# Altium PCB PCI Express Mini_3000X5095_52PIN_Full-Mini-Type F1.PCBDOC (part 7 of 7)
Units mm, origin at the board's own origin, x right, y up, seen from the top; angles counter-clockwise.
Board outline 70 x 83.2 mm, 6 copper layers (TopLayer, Layer 1, Layer 2, Layer 3, Layer 4, Bottom Layer), stack 1.013 mm thick; 332 components, 213 nets, 1105 pads, 528 vias.
Unrouted connection lines stored in the file: 10.
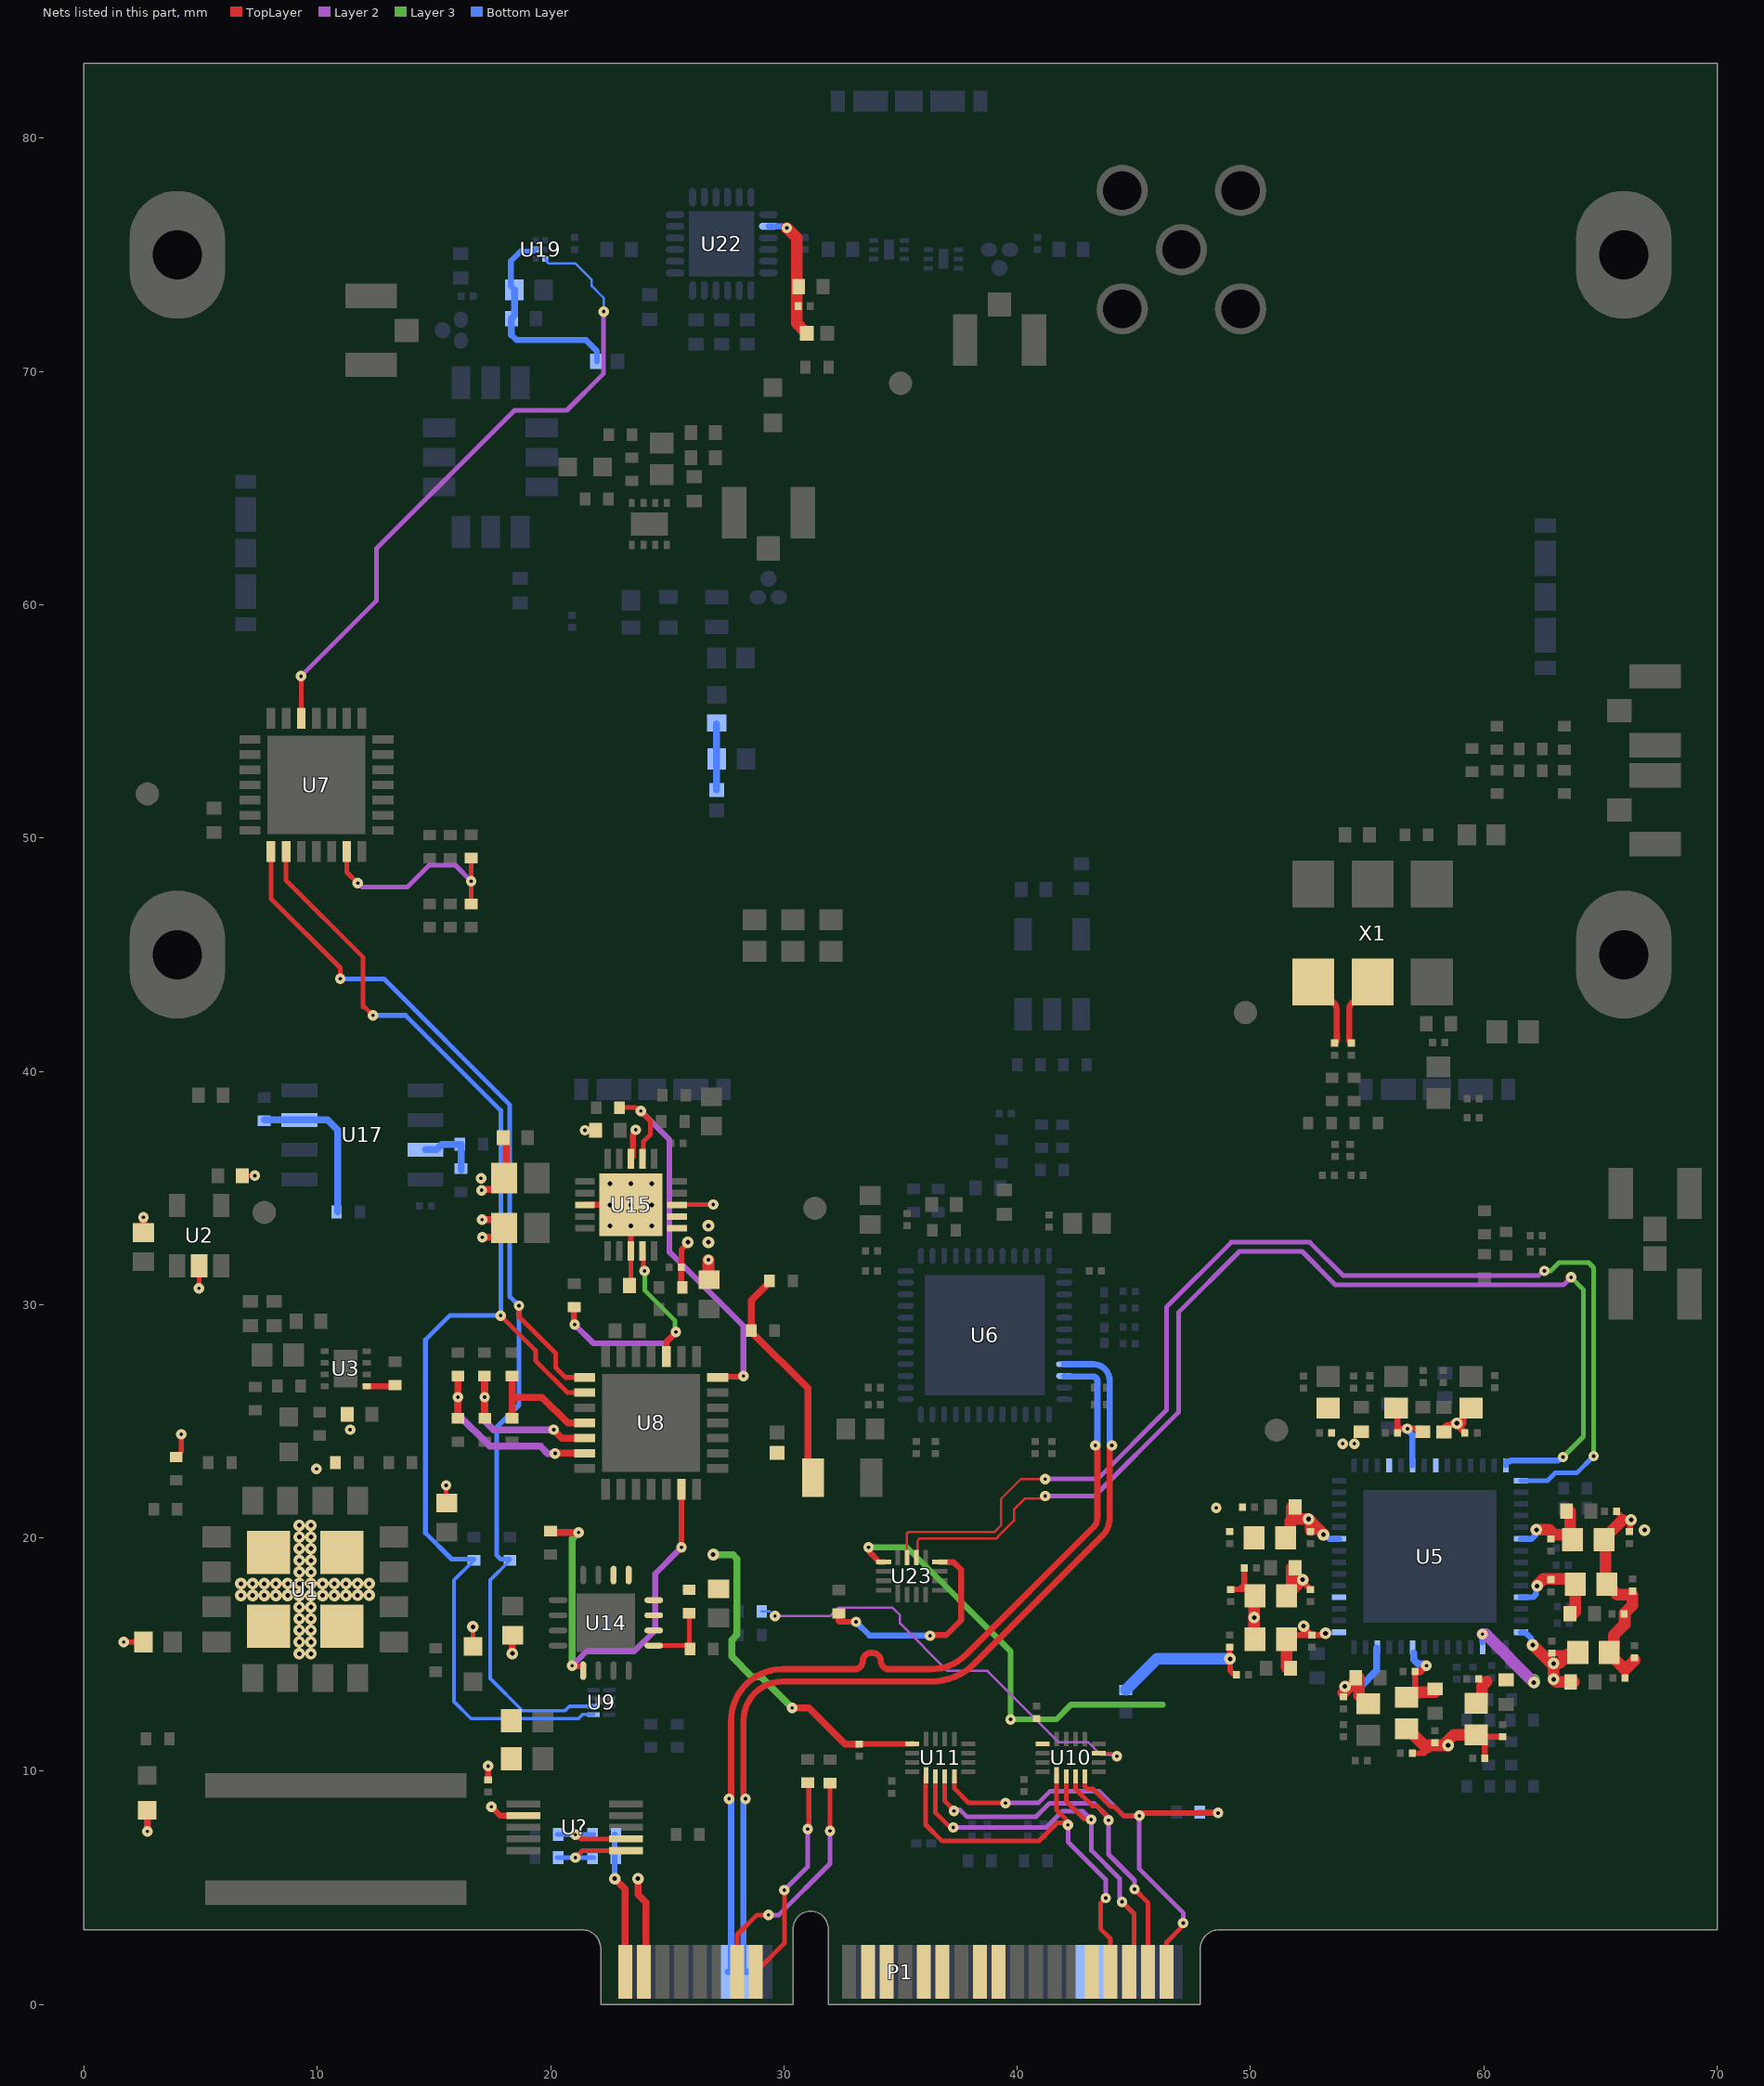
[diagram p8: the nets of this part, all layers, seen from the top]

## Via types
v1: diameter 0.45, hole 0.15, TopLayer to Bottom Layer, tented both sides, 263 vias
v2: diameter 0.5, hole 0.2, TopLayer to Bottom Layer, tented both sides, 200 vias
v3: diameter 0.5, hole 0.2, TopLayer to Bottom Layer, 36 vias
v4: diameter 0.45, hole 0.15, TopLayer to Bottom Layer, 29 vias

## Nets (pads, with @x,y where several pads share a name; then routed paths per layer and width w, separated by ;. In a path a pad name is that pad's centre, name@x,y a point inside that pad or via, vN(x,y) a via of type N, cw(c..) or ccw(c..) an arc to the next point about the centre after c; other vN are vias at no path point) (continued)
NetR59_2: R59.2 R62.2 U7.13 | length 9.2
  TopLayer w0.2: U7.13@11.267,49.427 11.267,48.536 v1(11.737,48.066) ; R59.2@16.596,47.127 v1(16.596,48.153) R62.2@16.596,49.189
  Layer 2 w0.2: v1(11.737,48.066) 11.757,48.066 11.917,47.906 13.87,47.906 14.795,48.832 15.917,48.832 v1(16.596,48.153)
NetR67_2: R67.2 R72.2 U8.11 | length 5.5
  TopLayer w0.3: R72.2@18.351,25.073 18.351,26.033 ; R67.2@18.351,26.992 18.351,26.033 ; U8.11@21.46,24.929 20.74,24.929 19.637,26.033 18.351,26.033
NetR68_2: R68.2 R73.2 U8.12 | length 7.5
  TopLayer w0.3: R68.2@17.162,26.992 17.174,26.98 v1(17.174,26.033) 17.174,25.086 R73.2@17.187,25.073 ; v1(20.133,24.638) 20.492,24.279 U8.12@21.46,24.279
  Layer 2 w0.3: v1(17.174,26.033) 17.162,26.02 17.162,25.031 17.554,24.638 v1(20.133,24.638)
NetR69_2: R69.2 R74.2 U8.13 | length 8.8
  TopLayer w0.3: R74.2@16.032,25.073 v1(16.032,26.033) R69.2@16.032,26.992 ; v1(20.193,23.622) 20.2,23.629 U8.13@21.46,23.629
  Layer 2 w0.3: v1(16.032,26.033) 16.032,25.595 16.032,25.29 17.396,23.926 19.561,23.926 19.865,23.622 v1(20.193,23.622)
NetR75_2: R75.2 U23.8 | length 9.3
  TopLayer w0.25: R75.2@32.349,16.764 32.349,16.444 32.393,16.401 v1(33.093,16.401) ; v1(36.264,15.809) 36.288,15.834 36.954,15.834 37.592,16.472 37.592,18.642 37.27,18.964 U23.8@36.677,18.964
  Bottom Layer w0.25: v1(33.093,16.401) 33.672,15.821 36.251,15.821 v1(36.264,15.809)
NetR87_1: R87.1 U10.7 | length 19.2
  TopLayer w0.1: U10.7@43.495,10.779 44.047,10.779 44.178,10.648 v1(44.272,10.648)
  Layer 2 w0.1: v1(29.617,16.653) 31.984,16.653 32.339,17.007 34.662,17.007 34.975,16.694 34.975,16.341 37.014,14.301 38.722,14.301 41.792,11.232 43.055,11.232 43.582,10.705 44.215,10.705 v1(44.272,10.648)
  Layer 3 w0.1: v1@29.617,16.607 v1(29.617,16.653)
  Bottom Layer w0.1: R87.1@29.05,16.852 29.399,16.852 29.598,16.653 v1(29.617,16.653)
NetR98_1: R98.1 R99.2 U14.9 | length 3.1
  TopLayer w0.2: U14.9@24.423,15.384 R99.2@25.883,15.384 ; R98.1@25.942,16.826 25.942,15.325 R99.2@26.025,15.242
NetR108_1: R108.1 R110.2 U?.2 | length 3.8
  TopLayer w0.2: v1(21.064,7.285) 21.118,7.285 21.309,7.094 U?.2@23.227,7.094
  Bottom Layer w0.2: R110.2@20.275,7.285 v1(21.064,7.285) R108.1@21.853,7.285
NetR109_1: R109.1 R111.2 U?.1 | length 3.9
  TopLayer w0.2: v1(21.062,6.294) 21.362,6.594 U?.1@23.227,6.594
  Bottom Layer w0.2: R111.2@20.28,6.294 v1(21.062,6.294) R109.1@21.844,6.294
NetR112_1: R112.1 R115.2 U17.7 | length 2.7
  Bottom Layer w0.3: U17.7@14.637,36.644 15.112,36.644 15.34,36.872 16.161,36.872 R112.1@16.161,35.78
NetR113_1: R113.1 R114.2 U17.3 | length 6.8
  Bottom Layer w0.3: R114.2@7.728,37.931 7.737,37.922 9.228,37.922 U17.3@9.237,37.914 10.439,37.914 10.877,37.475 R113.1@10.877,33.977
NetR123_2: R123.2 U3.5 | length 1.3
  TopLayer w0.25: U3.5@12.116,26.507 13.233,26.507 R123.2@13.329,26.602
PER0_N: P1.21
PER0_P: P1.19
PER1_N: P1.27
PER1_P: P1.25
PER2_N: P1.33
PER2_P: P1.31
PERST2#: P1.43
PET3_N: P1.44
PET3_P: P1.42
PG_LMK_1V8: R105.1 U8.3 U15.9 | length 10.9
  TopLayer w0.2: U15.9@23.945,32.304 23.985,32.264 23.985,31.487 v1(24.03,31.442)
  TopLayer w0.25: R105.1@21.01,29.895 21.005,29.891 21.005,29.173 v1(21.031,29.147) ; U8.3@24.96,27.779 24.96,28.402 25.375,28.817 v1(25.375,28.829)
  Layer 2 w0.25: v1(21.031,29.147) 21.837,28.341 24.899,28.341 25.375,28.817 v1(25.375,28.829)
  Layer 3 w0.2: v1(24.03,31.442) 24.03,30.619 25.327,29.322 25.327,28.877 v1(25.375,28.829)
PG_LMK_3V3: R104.1 U8.28 U15.17 | length 17.6
  TopLayer w0.2: R104.1@22.96,38.442 23.651,38.442 23.797,38.296 v1(23.864,38.296) ; v1@23.856,38.305 24.271,37.889 24.271,37.477 24.284,37.465 24.284,37.299 23.985,37 23.985,36.294 U15.17@23.945,36.254
  TopLayer w0.25: U8.28@27.16,26.879 27.193,26.912 28.235,26.912 v1(28.264,26.941)
  Layer 2 w0.25: v1(23.864,38.296) 25.096,37.065 25.096,32.256 28.264,29.089 v1(28.264,26.941)
PG_LTC2122: R97.1 U8.20 U14.5 | length 18.2
  TopLayer w0.25: v1(20.923,14.52) 20.952,14.492 U14.5@21.398,14.492 ; v1(25.61,19.594) U8.20@25.61,22.079
  TopLayer w0.3: R97.1@19.993,20.241 19.997,20.237 21.201,20.237 v1(21.205,20.233)
  Layer 2 w0.25: v1(20.923,14.52) 21.544,15.141 23.581,15.141 24.481,16.042 24.481,18.465 v1(25.61,19.594)
  Layer 3 w0.3: v1(20.923,14.52) 20.923,19.951 v1(21.205,20.233)
PGND: C1.1 C2.1 C3.1 C5.1 C6.1 C10.1 C91.1 C139.1 C140.1 C151.1 C152.1 C153.1 D9.2 D11.2 FB30.1 FB31.1 P1.1 P1.3 R4.1 R5.1 R108.2 R109.2 U1.EP U2.2 U15.3 U15.8 U15.13 U15.18 U15.21 U?.7 | length 32
  TopLayer w0.2: v1(1.702,15.538) C1.1@2.606,15.538 ; R5.1@3.955,23.47 4.005,23.47 4.13,23.595 4.13,23.671 4.171,23.712 v1(4.171,24.445) ; v1(4.931,30.696) 4.931,31.539 U2.2@4.938,31.545 ; C5.1@6.657,35.524 v1@7.332,35.524 ; v1(15.519,22.25) 15.519,21.538 C2.1@15.558,21.5 ; D9.2@16.674,15.344 v2(16.674,16.194) ; v1(21.47,37.475) C152.1@22.051,37.475 ; C151.1@23.385,30.822 23.445,30.882 U15.8@23.445,32.304 ; U15.13@25.577,34.278 25.587,34.288 v1(26.969,34.288)
  TopLayer w0.25: C153.1@17.323,9.627 v1(17.323,10.22) ; v1(17.46,8.472) 17.837,8.094 U?.7@18.827,8.094 ; U15.3@21.47,34.279 v2(22.545,34.279) v2(23.445,34.279) v2(23.445,33.379) U15.8@23.445,32.304 ; U15.18@23.445,36.254 23.528,36.337 23.528,37.317 23.653,37.441 v1(23.653,37.495)
  TopLayer w0.3: C3.1@2.55,33.183 v1(2.55,33.747) ; v1(2.715,7.421) D11.2@2.715,8.325 ; v1(17.061,33.648) C139.1@17.625,33.647 ; v1@17.061,34.946 C140.1@17.625,34.946 ; v1(17.074,32.886) C139.1@17.638,32.885 ; C140.1@18.011,35.427 18.101,35.517 C10.1@18.101,37.154 ; v2(18.36,15.044) 18.36,15.817 C91.1@18.376,15.834 ; v2(22.753,5.397) 23.2,4.95 P1.1@23.2,1.4 ; v2(23.748,5.397) 23.748,4.717 24.086,4.379 24.086,1.414 P1.3@24.072,1.4
  Bottom Layer w0.25: v2(22.753,5.397) 22.749,5.401 22.749,6.29 22.744,6.294 22.749,6.299 22.749,7.28 R108.2@22.753,7.285
  other v1: 9.967,22.958 11.408,24.638 17.048,34.903 17.019,35.411 7.329,35.53
  other v2: 9.228,15.038 9.728,15.038 9.228,15.538 9.728,15.538 9.228,16.038 9.728,16.038 9.228,16.538 9.728,16.538 9.229,17.039 9.729,17.039 6.729,17.538 7.229,17.538 7.729,17.538 8.229,17.538 8.729,17.539 9.229,17.539 9.729,17.539 10.229,17.539 10.729,17.539 11.229,17.539 11.728,17.539 12.228,17.54 6.729,18.038 7.229,18.038 7.729,18.038 8.229,18.038 8.729,18.039 9.229,18.039 9.729,18.039 10.229,18.039 10.729,18.039 11.229,18.039 11.728,18.039 12.228,18.04 9.229,18.539 9.729,18.539 9.228,19.039 9.728,19.039 9.228,19.539 9.728,19.539 9.228,20.039 9.728,20.039 9.228,20.539 9.728,20.539 22.545,33.379 24.345,33.379 24.345,34.279 22.545,35.179 23.445,35.179 24.345,35.179
PON_TETRA: U7.26 U19.6 | length 28.1
  TopLayer w0.2: v1(9.302,56.938) 9.309,56.931 9.309,55.135 U7.26@9.317,55.127
  Layer 2 w0.2: v1(9.302,56.938) 12.546,60.181 12.546,62.426 18.452,68.332 20.697,68.332 22.276,69.912 v1(22.276,72.568)
  Bottom Layer w0.1: U19.6@19.767,74.859 U19.6@19.767,74.825 19.842,74.75 19.842,74.694 19.9,74.635 21.062,74.635 21.768,73.929 21.768,73.659 22.276,73.151 v1(22.276,72.568)
ResetN_1V8: U5.15 U23.11 | length 51.6
  TopLayer w0.1: U23.11@35.277,19.164 35.277,20.191 35.335,20.249 38.613,20.249 39.021,20.249 39.31,20.538 39.31,21.675 40.158,22.523 v4@41.353,22.523
  Layer 2 w0.2: v4(41.199,22.523) 43.447,22.523 46.406,25.482 46.406,29.902 49.177,32.673 52.544,32.673 53.961,31.256 62.353,31.256 62.541,31.444 v1(62.595,31.444)
  Layer 3 w0.2: v1(62.595,31.444) 62.868,31.444 63.229,31.805 64.488,31.805 64.704,31.589 v1(64.704,23.506)
  Bottom Layer w0.2: U5.15@61.593,22.456 62.732,22.456 63.057,22.781 63.979,22.781 v1(64.704,23.506)
SCK: R11.2 U7.8 U8.8 U9.6 | length 52
  TopLayer w0.2: U7.8@8.017,49.427 8.017,47.402 10.983,44.436 v1(10.983,43.967) ; v1(18.645,29.954) 18.645,29.485 20.209,27.921 20.209,27.306 20.635,26.879 U8.8@21.46,26.879
  Bottom Layer w0.15: R11.2@18.257,19.089 R11.2@18.257,19.039 17.411,18.192 17.411,13.973 18.793,12.591 20.614,12.591 20.805,12.781 U9.6@21.844,12.781
  Bottom Layer w0.2: v1(10.983,43.967) 12.852,43.967 18.257,38.563 18.257,30.342 v1(18.645,29.954) 18.645,25.695 17.688,24.738 17.688,19.262 17.861,19.089 R11.2@18.257,19.089
SDA: R10.2 U7.9 U8.9 U9.5 | length 57.1
  TopLayer w0.2: U7.9@8.667,49.427 8.663,49.424 8.663,48.199 8.659,48.195 11.966,44.888 11.966,42.756 12.033,42.756 v1(12.391,42.398) ; v1(17.861,29.531) 19.357,28.035 19.357,27.592 20.72,26.229 U8.9@21.46,26.229
  Bottom Layer w0.15: R10.2@16.711,19.089 R10.2@16.711,19.039 15.861,18.189 15.861,12.981 16.589,12.253 21.188,12.253 21.367,12.431 U9.5@21.844,12.431
  Bottom Layer w0.2: v1(12.391,42.398) 13.787,42.398 17.861,38.325 v1(17.861,29.531) 15.675,29.531 14.637,28.493 14.637,20.214 15.762,19.089 R10.2@16.711,19.089
SMCLK: P1.15 R71.1 | length 9
  TopLayer w0.2: P1.15@28.8,1.4 30.021,2.621 v1(30.021,4.904) ; v4(31.025,7.517) 31.025,7.571 31.072,7.618 R71.1@31.072,9.507
  Layer 2 w0.2: v1(30.021,4.904) 31.025,5.908 v4(31.025,7.517)
SMDAT: P1.13 R70.1 | length 10.3
  TopLayer w0.2: P1.13@28,1.4 28,2.991 28.844,3.835 v1(29.337,3.835) ; v4(31.98,7.444) 31.98,9.532 31.977,9.536 R70.1@31.982,9.541
  Layer 2 w0.2: v1(29.337,3.835) 29.779,3.835 31.98,6.036 v4(31.98,7.444)
SPI_1V8_ADC: C15.1 C75.2 FB6.1 FB7.1 R14.2 R15.2 R98.2 U11.13 U14.10 U14.11 U14.12 U14.13 U14.14 | length 24.6
  TopLayer w0.25: C15.1@33.228,11.168 33.234,11.174 35.495,11.174 U11.13@35.5,11.179
  TopLayer w0.3: v2(26.969,19.28) 26.969,19.285 v2@27.028,19.344 ; R15.2@29.386,31.016 29.386,30.966 28.604,30.184 R14.2@28.604,28.887 28.604,28.837 31.025,26.416 31.025,22.811 FB7.1@31.25,22.585 ; v1(30.357,12.711) 31.074,12.711 32.617,11.168 C15.1@33.228,11.168
  Layer 3 w0.3: v2(26.969,19.28) 27.819,19.28 27.995,19.104 27.995,15.849 27.772,15.626 27.772,14.915 28.634,14.054 29.014,14.054 v1(30.357,12.711)
  Layer 3 w0.5: v2(26.969,19.28) v2@26.995,19.305
SPI_1V8_CLK: C71.1 C113.2 C114.2 C117.2 C118.2 C121.2 C122.2 C125.2 C126.2 C131.2 C132.2 C135.2 C136.2 C141.2 C142.2 C143.2 C144.2 C147.2 C148.2 FB13.1 FB14.1 FB16.1 FB17.1 FB18.1 FB19.1 FB20.1 FB21.1 R12.2 R102.2 U10.13 U15.11 U15.12 U23.13 | length 48.3
  TopLayer w0.25: R102.2@25.596,30.74 25.601,30.745 25.601,31.591 C142.2@25.606,31.596 25.606,32.349 25.883,32.626 v2(25.883,32.673) ; v1(33.628,19.594) 33.666,19.556 33.666,19.4 34.102,18.964 U23.13@34.277,18.964 ; C118.2@49.099,15.316 49.112,15.303 49.112,14.832 v2(49.125,14.82) 49.125,14.319 49.271,14.173 49.365,14.173 C117.2@49.365,14.103 ; C125.2@49.14,17.796 49.528,17.796 ; C126.2@49.739,18.718 49.739,18.007 49.528,17.796 ; FB17.1@50.197,17.514 49.915,17.796 49.528,17.796 ; C148.2@56.944,10.769 57.443,10.769 ; FB13.1@59.671,11.565 59.712,11.565 FB13.1@59.799,11.479 ; C114.2@60.037,10.557 60.037,11.24 FB13.1@59.799,11.479 ; C113.2@60.802,11.479 FB13.1@59.799,11.479 ; C121.2@65.695,21.145 65.695,21.135 65.955,20.875 65.955,20.777 ; C122.2@66.24,20.269 66.265,20.294 66.265,20.729 v2(66.313,20.777)
  TopLayer w0.5: v4(26.764,31.921) 26.764,31.089 C141.2@26.788,31.065 ; FB14.1@50.197,15.657 50.161,15.693 v2(50.161,16.586) 50.161,17.478 FB17.1@50.197,17.514 ; FB21.1@56.684,11.817 56.734,11.817 57.554,10.997 57.669,11.112 v2(58.47,11.112) ; v2@58.373,11.225 58.714,11.565 FB13.1@59.671,11.565 ; 65.955,20.777 65.156,19.978 FB16.1@65.156,19.928 65.215,19.869 65.215,18.073 FB18.1@65.274,18.014 65.274,17.964 65.474,17.764 65.524,17.764 65.721,17.567 66.373,17.567 66.373,17.114 66.039,16.781 66.039,16.301 65.579,15.841 65.579,15.288 FB20.1@65.379,15.088 65.379,15.038 66.059,14.358 C143.2@66.457,14.756
  Layer 3 w0.25: v1(33.628,19.594) 35.263,19.594 39.717,15.139 v4(39.717,12.222) 41.671,12.222 42.302,12.852 46.239,12.852
  Bottom Layer w0.5: R12.2@44.655,13.481 45.993,14.82 v2(49.125,14.82)
  other v1: 48.532,21.289
  other v2: 66.89,20.338 26.764,32.673 26.764,33.382
SPI_CLK_MB: P1.45 U10.1 U11.1 | length 18.4
  TopLayer w0.2: U11.1@36.1,9.829 36.076,9.805 36.076,7.71 36.783,7.004 40.931,7.004 41.725,7.798 42.125,7.798 42.176,7.747 v4(42.176,7.697) ; U10.1@41.695,9.829 41.695,8.336 42.176,7.855 v4@42.176,7.798 ; v1(43.797,4.566) 43.572,4.341 43.572,3.245 44,2.817 P1.45@44,1.4
  Layer 2 w0.2: v4(42.176,7.697) 42.176,6.974 43.797,5.353 v1(43.797,4.566)
SPI_MISO_MB: P1.49 U10.3 U11.3 | length 18.8
  TopLayer w0.2: U11.3@36.9,9.779 36.9,8.718 37.292,8.326 v1(37.292,8.298) ; U10.3@42.495,9.779 42.495,9.238 43.223,8.51 43.415,8.51 43.917,8.009 v4(43.917,7.899) ; v1(45.027,4.946) 45.6,4.373 P1.49@45.6,1.4
  Layer 2 w0.2: v1(37.292,8.298) 37.333,8.339 37.554,8.339 37.84,8.053 40.811,8.053 41.39,8.632 43.293,8.632 43.917,8.009 43.917,6.433 45.027,5.323 v1(45.027,4.946)
SPI_MOSI_MB: P1.47 U10.2 U11.2 | length 18.8
  TopLayer w0.2: U11.2@36.5,9.779 36.5,8.22 37.084,7.637 37.212,7.637 v1(37.26,7.589) ; U10.2@42.095,9.779 42.095,8.728 42.873,7.95 43.148,7.95 v4(43.17,7.928) ; v1(44.494,4.402) 45.006,3.89 45.006,2.567 45,2.561 45,1.6 P1.47@44.8,1.4
  Layer 2 w0.2: v1(37.26,7.589) 41.24,7.589 41.933,8.282 42.815,8.282 v4(43.17,7.928) ; v4@43.183,7.928 43.183,6.601 44.384,5.4 44.384,4.566 44.494,4.456 v1(44.494,4.402)
SPI_nCS_1_MB: P1.51 R64.2 U10.4 U11.4 | length 24.6
  TopLayer w0.2: U11.4@37.3,9.779 37.3,9.266 37.928,8.638 v1(39.496,8.638) ; U10.4@42.895,9.779 42.895,9.353 43.013,9.236 43.258,9.236 44.01,8.484 44.159,8.484 44.552,8.092 v4(45.235,8.092) ; P1.51@46.4,1.4 46.4,2.665 47.113,3.378 v1(47.113,3.489)
  TopLayer w0.25: v4(45.235,8.092) 45.289,8.092 45.408,8.21 v1(48.607,8.21)
  Layer 2 w0.2: v1(39.496,8.638) 40.901,8.638 41.399,9.136 43.517,9.136 44.562,8.092 v4(45.235,8.092) 45.235,5.814 47.113,3.936 v1(47.113,3.489)
  Bottom Layer w0.25: R64.2@47.83,8.241 47.846,8.226 48.591,8.226 v1(48.607,8.21)
Sync_04610: U5.14 U23.10 | length 48.5
  TopLayer w0.1: U23.10@35.677,19.164 35.727,19.214 35.727,19.882 35.817,19.972 39.107,19.972 39.165,20.03 39.165,20.04 39.86,20.735 39.86,21.225 40.327,21.692 v4@41.347,21.692
  Layer 2 w0.2: v4(41.199,21.793) 43.318,21.793 46.912,25.387 46.912,29.67 49.522,32.28 52.21,32.28 53.639,30.85 63.42,30.85 v1(63.742,31.171)
  Layer 3 w0.2: v1(63.392,23.467) 64.271,24.346 64.271,30.642 v1(63.742,31.171)
  Bottom Layer w0.25: U5.14@60.943,23.106 60.948,23.111 60.948,23.281 61.118,23.281 61.152,23.316 63.187,23.316 63.3,23.429 63.351,23.429 v1@63.398,23.382
SYNC_N: P1.12 U6.22 | length 38.9
  TopLayer w0.267: v1(27.645,8.819) ccw(c27.645,8.914) 27.74,8.914 27.74,12.169 cw(c29.945,12.169) 29.945,14.373 32.899,14.373 33.033,14.373 ccw(c33.033,14.722) 33.381,14.722 cw(c33.73,14.722) 33.73,15.07 33.808,15.07 cw(c33.808,14.722) 34.156,14.722 ccw(c34.505,14.722) 34.505,14.373 36.313,14.373 36.739,14.417 ccw(c36.313,16.476) 36.872,14.449 ccw(c36.313,16.476) 37.8,14.989 43.265,20.454 ccw(c42.842,20.876) 43.44,20.876 43.44,23.87 ccw(c43.348,23.87) v1(43.348,23.961)
  Bottom Layer w0.267: P1.12@27.6,1.4 ccw(c27.6,1.537) 27.737,1.537 27.737,8.727 ccw(c27.645,8.727) v1(27.645,8.819) ; U6.22@42.017,26.942 42.044,26.915 43.264,26.915 cw(c43.264,26.743) 43.437,26.743 43.437,24.414 ; v1(43.348,23.961) ccw(c43.348,24.053) 43.44,24.053 43.44,24.414
SYNC_P: P1.14 U6.21 | length 39.1
  TopLayer w0.267: v1(28.355,8.819) cw(c28.355,8.906) 28.267,8.906 28.267,12.169 cw(c29.945,12.169) 29.945,13.846 36.314,13.846 ccw(c36.314,16.474) 38.172,14.616 43.639,20.083 ccw(c42.848,20.874) 43.967,20.874 43.967,23.87 cw(c44.058,23.87) v1(44.058,23.962)
  Bottom Layer w0.267: P1.14@28.267,1.533 P1.14@28.4,1.4 cw(c28.4,1.536) 28.264,1.536 28.264,8.727 cw(c28.355,8.727) v1(28.355,8.819) ; U6.21@42.017,27.442 43.264,27.442 cw(c43.264,26.743) 43.964,26.743 43.964,24.414 ; 43.967,24.414 43.967,24.053 ccw(c44.058,24.053) v1(44.058,23.962)
Vcc_2V8_Tor1: C165.2 C166.2 FB22.2 U19.2 | length 9
  Bottom Layer w0.2: 18.71,75.15 U19.2@19.258,75.15
  Bottom Layer w0.22: U19.2@19.258,75.15 U19.2@19.367,75.259
  Bottom Layer w0.25: 18.324,71.566 18.545,71.345 21.51,71.345 21.99,70.865 FB22.2@21.99,70.434 ; C165.2@18.449,73.503 18.299,73.653 18.299,74.739 18.71,75.15
  Bottom Layer w0.3: 18.324,71.566 C166.2@18.324,72.27 18.449,72.395 C165.2@18.449,73.503
Vcc_5V_AMP_1: C161.1 FB26.2 R119.2 | length 2.8
  Bottom Layer w0.3: FB26.2@27.119,52.062 C161.1@27.12,53.393 ; C161.1@27.12,53.393 R119.2@27.12,54.885
Vcc_5V_ATT_1: C180.2 C181.2 FB24.2 U22.2 | length 5.7
  TopLayer w0.5: v1(30.125,76.152) 30.556,75.72 30.556,72.058 30.91,71.705 30.93,71.705 30.98,71.655 FB24.2@30.98,71.635
  Bottom Layer w0.25: U22.2@29.337,76.225 30.011,76.225 30.084,76.152 v1(30.125,76.152)
VCXO_OUT_N: C43.2 X1.5 | length 3.1
  TopLayer w0.267: C43.2@54.271,41.256 54.313,41.215 C43.2@54.323,41.215 ; C43.2@54.271,41.256 cw(c54.371,41.356) 54.23,41.356 54.23,42.136 54.227,42.14 54.227,42.627 cw(c54.66,42.627) 54.354,42.933 cw(c54.425,42.862) 54.425,42.963 ccw(c54.425,43.064) X1.5@54.496,42.992 ; X1.5@54.496,42.993 55.162,43.659 ccw(c54.992,43.829) X1.5@55.233,43.829
VCXO_OUT_P: C40.2 X1.4 | length 3.1
  TopLayer w0.267: X1.4@52.693,43.829 ccw(c52.935,43.829) 52.764,43.659 53.43,42.993 ccw(c53.501,43.064) 53.501,42.963 cw(c53.501,42.862) 53.573,42.933 cw(c53.267,42.627) 53.7,42.627 53.7,41.616 53.703,41.613 53.703,41.356 cw(c53.562,41.356) 53.661,41.256 53.62,41.215 C40.2@53.61,41.215
VDD_CORE: C95.2 C96.2 FB8.2 U5.8 | length 2.1
  TopLayer w0.3: C96.2@58.285,24.683 58.285,24.688 58.405,24.808 58.548,24.808 58.618,24.878 58.81,24.878 v2(58.848,24.916) ; v2@58.848,24.846 59.029,24.846 59.104,24.921 59.104,25.263 59.404,25.563 FB8.2@59.454,25.563 ; v2@58.947,24.764 59.194,24.518 C95.2@59.194,24.508
VDD_IO: C115.2 C116.2 FB13.2 U5.31 | length 4.7
  TopLayer w0.5: FB13.2@59.671,12.915 59.721,12.915 59.921,13.115 59.921,13.643 60.127,13.85
  Layer 2 w0.5: v1(59.943,15.877) 60.071,15.877 v2(62.144,13.805)
  Layer 3 w0.5: v2(62.144,13.805) v2@62.144,13.929
  Bottom Layer w0.25: U5.31@59.943,15.521 v1(59.943,15.877)
VDD_OSC: C149.2 C150.2 FB21.2 U5.37 | length 3.8
  TopLayer w0.25: FB21.2@56.684,13.167 56.729,13.167 56.929,13.367 57.054,13.492 C149.2@57.054,14.273
  TopLayer w0.3: C149.2@57.054,14.273 57.271,14.273 57.522,14.524 v1(57.539,14.524)
  TopLayer w0.5: FB21.2@56.929,13.367 57.26,13.367 57.289,13.396 C150.2@57.909,13.396
  Bottom Layer w0.3: U5.37@57.003,15.06 57.003,14.779 57.183,14.599 57.424,14.599 57.499,14.524 v1(57.539,14.524)
VDD_PLL1: C99.2 C100.2 FB9.2 U5.40 | length 4.8
  TopLayer w0.5: 53.978,13.352 54.637,14.012 54.642,14.012 54.642,13.251 54.999,12.894 FB9.2@55.049,12.894
  Bottom Layer w0.3: v2(54.045,13.636) 54.72,13.636 55.409,14.325 U5.40@55.409,15.273
VDD_PLL2CORE: C103.2 C104.2 FB10.2 U5.6 | length 3.7
  TopLayer w0.25: FB10.2@56.239,25.563 56.297,25.505 C103.2@56.297,24.514 ; C103.2@56.297,24.504 C103.2@56.297,24.514 ; 56.471,24.688 C103.2@56.297,24.514 ; v1@56.724,24.688 C104.2@57.383,24.688
  Bottom Layer w0.25: v1(56.724,24.682) 56.724,24.642 56.943,24.423 U5.6@56.943,23.106
VDD_PLL2OSC: C107.2 C108.2 FB11.2 U5.4
  other v1: 53.951,24.039 54.447,24.039
VDDO_1/2: C123.2 C124.2 FB16.2 U5.20 | length 3.8
  TopLayer w0.5: v2(62.255,20.345) 62.809,20.345 63.014,20.141 63.606,20.141 FB16.2@63.7,20.047 ; C124.2@63.675,21.145 63.68,21.145 63.7,21.125 FB16.2@63.7,20.047 ; FB16.2@63.806,19.928 63.806,19.941 FB16.2@63.7,20.047
  Bottom Layer w0.25: U5.20@61.593,19.956 62.04,19.956 62.208,20.123 62.208,20.298 v2(62.255,20.345)
VDDO_3/4: C133.2 C134.2 FB18.2 U5.25 | length 4.3
  TopLayer w0.5: v2(62.289,17.94) 62.289,17.974 62.558,18.244 63.724,18.244 63.924,18.044 FB18.2@63.924,18.014 63.924,16.841 63.834,16.751 C134.2@63.829,16.751
  Bottom Layer w0.25: U5.25@61.593,17.456 62.109,17.456 62.241,17.588 62.241,17.892 v2(62.289,17.94)
VDDO_5: C145.2 C146.2 FB20.2 U5.28 | length 5.3
  TopLayer w0.25: C145.2@62.911,15.064 FB20.2@63.675,15.064
  TopLayer w0.5: v2(62.093,15.41) 62.887,14.615 v2(62.987,14.615) ; FB20.2@63.675,15.064 63.226,14.615 v2(62.987,14.615) ; C146.2@63.857,13.824 63.103,13.824 v2(62.987,13.94) v2(62.987,14.615)
  Bottom Layer w0.25: U5.28@61.593,15.956 61.763,15.956 62.045,15.674 62.045,15.458 v2(62.093,15.41)
VDDO_6: C119.2 C120.2 FB14.2 U5.43 | length 3.6
  TopLayer w0.25: FB14.2@51.547,15.657 51.725,15.836 C119.2@52.624,15.836 ; v2(52.277,16.216) 52.277,16.182 C119.2@52.624,15.836 ; v2(53.217,15.911) 53.149,15.911 53.073,15.836 C119.2@52.634,15.836 C119.2@52.624,15.836
  TopLayer w0.5: FB14.2@51.547,15.657 51.565,15.639 51.565,15.176 51.54,15.151 51.54,14.458 C120.2@51.584,14.414
VDDO_7/8: C127.2 C128.2 FB17.2 U5.46 | length 2.2
  TopLayer w0.25: v2(52.235,18.211) 52.282,18.163 52.282,18.079 52.566,17.796 C127.2@52.576,17.796
  TopLayer w0.5: C128.2@51.773,18.718 51.773,17.749 v2(52.235,18.211)
VDDO_9/10: C137.2 C138.2 FB19.2 U5.51 | length 4.2
  TopLayer w0.5: FB19.2@51.5,20.009 51.7,20.209 51.7,20.72 51.764,20.784 ; C138.2@51.778,21.323 51.764,21.309 51.764,20.784 ; C137.2@52.576,20.342 v2@52.576,20.724 ; v2(53.128,20.14) 53.128,20.172 v2@52.576,20.724 ; 51.764,20.784 51.792,20.811 v2(52.488,20.811) v2@52.576,20.724
  Bottom Layer w0.25: v2(53.128,20.14) 53.195,20.14 53.379,19.956 U5.51@53.793,19.956
pads on no net: D8.1 D8.3 D8.4 D8.6 FID1.0 FID2.0 FID3.0 FID4.0 FID5.0 FID6.0 H1.1 H2.1 H3.1 H4.1 H5.1 T2.2 U1.5 U1.6 U1.7 U1.8 U1.14 U1.15 U3.6 U4.6 U5. U5.1 U5.2 U5.3 U5.18 U5.19 U5.23 U5.24 U5.35 U5.36 U5.44 U5.45 U5.47 U5.48 U5.52 U5.53 U5.56 U6.27 U6.28 U6.33 U6.34 U7.7 U7.10 U7.15 U7.16 U7.17 U7.18 U7.19 U7.20 U7.21 U7.22 U7.23 U7.24 U8.7 U8.10 U8.15 U8.16 U8.25 U8.26 U8.27 U14.8 U17.1 U17.2 U23.5 U23.14 U23.15 X1.2

## Polygon pours and split planes (outlines as drawn)
12V on TopLayer "12V_L01_P191" (solid, remove dead copper, pour order 191): 2.1,30.677 2.1,32.237 2.395,32.532 4.495,32.532 4.495,22.566 6.285,20.776 6.285,12.574 7.79,11.069 15.841,11.084 16.389,10.536 16.389,8.865 4.688,8.865 3.209,10.344 3.209,16.772 2.689,17.274 2.689,30.088
GND_ATT on TopLayer "GND_ATT_L01_P197" (solid, remove dead copper, pour order 197): 63.547,56.41 65.595,58.457 69.441,58.457 69.441,81.293 1.346,81.418 1.346,58.009 12.451,58.009 17.367,53.094 17.367,51.855 23.169,46.052 40.99,46.052 42.372,47.434 42.372,53.635 45.148,56.41
GND on TopLayer "GND_L01_P193" (solid, remove dead copper, pour order 193): 20.973,30.184 27.435,30.184 28.087,30.837 28.087,37.67 27.489,38.268 24.023,38.268 4.742,38.268 1.346,41.663 1.346,57.803 12.267,57.803 17.158,52.912 17.158,51.731 23.112,45.777 41.072,45.777 42.639,47.343 42.639,53.45 45.265,56.076 63.397,56.076 65.67,58.349 69.441,58.349 69.441,4.264 68.783,3.606 48.105,3.606 47.038,2.54 32.343,2.54 31.974,2.908 31.974,3.861 31.924,3.861 31.595,4.191 30.553,4.191 30.288,3.925 30.288,2.908 29.97,2.59 24.584,2.59 24.584,5.983 19.194,10.154 19.194,16.402 18.807,16.789 18.374,16.789 16.383,18.78 16.383,22.285 15.114,23.554 15.114,28.441 16.857,30.184
PGND on TopLayer "PGND_L01_P195" (solid, remove dead copper, pour order 195): 18.357,13.333 19,12.69 19,10.13 19.48,9.65 20.466,9.659 24.59,5.535 24.59,3.391 0.647,3.391 0.356,3.683 0.356,38.1 17.968,38.1 18.593,37.475 18.593,32.724 17.974,32.104 15.017,32.104 11.472,28.559 11.029,28.559 10.602,28.131 10.602,26.138 10.809,25.931 10.953,25.931 10.953,25.913 11.302,25.564 11.757,25.564 11.757,24.614 12.051,24.32 13.09,24.32 13.487,23.922 13.487,22.568 12.725,21.806 12.725,14.534 13.927,13.333
3V3_MB on TopLayer "3V3_MB_L01_P187" (solid, remove dead copper, pour order 187): 36.2,11.279 34.113,11.279 33.765,10.931 33.765,9.266 33.94,9.091 36.2,9.091
SPI_1V8_ADC on TopLayer "SPI_1V8_ADC_L01_P181" (solid, remove dead copper, pour order 181): 32.171,22.294 32.171,21.589 31.541,20.959 31.541,18.748 30.038,17.245 29.019,17.25 cw(c28.925,18.211) 28.925,17.245 25.379,17.245 ccw(c25.379,17.041) 25.174,17.041 25.174,16.044 cw(c24.793,16.044) 24.793,15.663 24.387,15.663 cw(c24.387,16.027) 24.023,16.027 24.023,17.334 ccw(c23.748,17.334) 23.748,17.609 22.817,17.609 cw(c22.817,17.973) 22.453,17.973 22.453,19.344 22.711,19.602 28.39,19.602 29.382,20.594 29.348,20.628 29.348,23.644 29.348,23.96 29.575,24.186 31.876,24.186 32.171,23.891
4610_FINE_V on TopLayer "4610_FINE_V_L01_P057" (solid, remove dead copper, pour order 57): 24.952,34.668 25.004,34.616 25.734,34.616 26.294,34.616 ccw(c26.294,35.516) 26.383,34.62 27.238,34.616 27.425,34.803 27.425,37.967 27.298,38.094 25.346,38.094 25.346,36.739 24.952,36.345
SPI_1V8_CLK on TopLayer "SPI_1V8_CLK_L01_P056" (solid, remove dead copper, pour order 56): 39.465,12.515 41.395,12.506 41.395,11.043 39.465,11.043
2122_0VDD on TopLayer "2122_0VDD_L01_P076" (solid, pour order 76): 41.881,23.909 42.15,24.178 42.15,25.371 41.879,25.642 40.875,25.642 40.455,25.642 40.134,25.321 40.134,24.065 40.29,23.909
3V6_DCDC on TopLayer "3V6_DCDC_L01_P192" (solid, remove dead copper, pour order 192): 18.583,37.524 18.583,36.679 18.786,36.487 18.786,32.574 18.146,31.934 15.108,31.934 11.815,28.641 11.815,24.754 12.116,24.454 13.053,24.454 13.562,23.944 13.562,22.483 12.685,21.605 12.685,14.768 12.785,14.668 18.866,14.668 19.437,15.239 19.437,15.809 20.658,15.809 20.723,15.744 21.123,16.144 21.123,17.609 21.404,17.889 22.4,17.889 22.4,18.97 21.849,19.494 19.224,19.494 15.76,22.958 15.288,23.373 15.288,28.739 16.834,30.285 20.002,30.285 21.895,32.178 21.895,36.928 20.323,38.5 18.385,38.5 18.251,38.367 18.251,37.855
4610_FINE_V on TopLayer "4610_FINE_V_L01_P176" (solid, remove dead copper, pour order 176): 51.486,26.463 62.316,26.463 ccw(c61.595,27.026) 62.509,27.026 ccw(c60.843,27.026) 60.843,28.692 52.213,28.692 ccw(c52.213,27.965) 51.486,27.965
4610_FINE_V on TopLayer "4610_FINE_V_L01_P041" (solid, remove dead copper, pour order 41): 59.798,39.736 59.798,35.896 56.634,35.896 56.634,39.736
VDD_PLL2OSC on TopLayer "VDD_PLL2OSC_L01_P043" (solid, remove dead copper, pour order 43): 52.28,26.225 54.284,26.225 54.284,25.193 55.427,25.193 55.427,23.75 53.4,23.75 53.208,23.943 53.208,24.591 52.945,24.853 52.28,24.853
3V3_DIGIT on TopLayer "3V3_DIGIT_L01_P190" (solid, remove dead copper, pour order 190): 7.881,29.735 7.881,25.875 6.951,25.875 6.234,26.592 6.234,29.087 6.882,29.735
NetC7_2 on TopLayer "NETC7_2_L01_P188" (solid, remove dead copper, pour order 188): 8.151,29.623 8.387,29.858 9.307,29.858 9.527,29.639 9.527,28.996 9.783,28.74 10.336,28.74 10.491,28.585 10.491,27.007 9.086,27.007 8.886,26.807 8.886,26.08 8.793,25.987 8.006,25.987 7.639,26.354 7.639,26.984 7.881,27.227 7.881,29.623
2122_VCC on TopLayer "2122_VCC_L01_P185" (solid, pour order 185): 28.49,24.101 28.097,24.494 28.097,26.303 30.344,26.303 30.707,25.939 30.707,24.32 30.488,24.101
4610_FINE_V on TopLayer "4610_FINE_V_L01_P178" (solid, pour order 178): 54.495,10.271 54.665,10.441 54.665,10.821 55.766,10.821 56.061,11.129 56.061,11.44 ccw(c55.324,11.44) 55.845,11.961 55.584,12.222 54.577,12.222 54.199,11.844 53.149,11.844 52.809,11.504 52.809,10.556 53.096,10.278 ccw(c53.165,10.627) 53.165,10.271
2122_VCC on TopLayer "2122_VCC_L01_P165" (solid, pour order 165): 41.476,33.495 ccw(c41.476,33.817) 41.797,33.817 cw(c42.269,33.817) 42.269,34.288 42.714,34.288 cw(c42.714,33.867) 43.134,33.867 43.134,32.383 ccw(c43.294,32.383) 43.294,32.223 cw(c43.294,32.069) 43.448,32.069 43.448,31.327 cw(c43.198,31.327) 43.198,31.077 41.711,31.077 cw(c41.711,31.54) 41.247,31.54 41.247,32.128 ccw(c40.961,32.128) 40.961,32.415 cw(c40.961,32.628) 40.747,32.628 40.747,33.388 cw(c40.854,33.388) 40.854,33.495
VDD_IO on TopLayer "VDD_IO_L01_P163" (solid, remove dead copper, pour order 163): 59.001,13.6 58.839,13.438 58.839,12.597 59.071,12.365 60.271,12.365 60.438,12.533 60.438,12.927 60.438,13.121 cw(c60.707,13.121) 60.707,13.39 60.997,13.39 61.325,13.39 cw(c61.325,13.231) 61.481,13.262 61.481,12.946 61.477,12.943 61.685,12.735 62.32,12.735 ccw(c62.32,13.005) 62.441,12.764 62.59,12.911 62.59,14.238 ccw(c62.291,14.238) 62.584,14.296 62.349,14.538 59.561,14.538 ccw(c59.561,14.494) 59.517,14.494 59.517,13.95 cw(c59.167,13.95) 59.167,13.6
2122_0VDD on TopLayer "2122_0VDD_L01_P161" (solid, pour order 161): 35.31,25.868 35.1,25.658 35.1,24.454 35.677,23.877 36.762,23.877 37.057,24.172 37.057,25.582 36.696,25.934 ccw(c36.608,25.494) 36.608,25.942 35.383,25.942
2122_VCC on TopLayer "2122_VCC_L01_P040" (solid, pour order 40): 41.497,25.473 41.434,25.536 41.434,26.722 41.5,26.788 43.423,26.788 43.525,26.686 43.525,25.406 43.411,25.292 41.672,25.292
GND_VCXO on TopLayer "GND_VCXO_L01_P053" (solid, remove dead copper, pour order 53): 51.373,50.23 51.553,50.41 53.909,50.41 54.462,50.41 54.561,50.41 54.616,50.355 54.616,49.247 54.559,49.19 53.986,49.19 53.986,47.006 54.129,46.863 59.596,46.863 61.158,45.301 61.158,41.301 60.65,40.792 58.396,40.792 58.248,40.941 58.248,42.529 58.373,42.529 58.673,42.829 58.673,45.129 52.064,45.129 51.373,45.82
2122_0VDD on TopLayer "2122_0VDD_L01_P052" (solid, remove dead copper, pour order 52): 33.049,23.881 35.677,23.881 35.677,21.477 33.049,21.477
2122_VCC on TopLayer "2122_VCC_L01_P050" (solid, remove dead copper, pour order 50): 33.255,32.858 33.649,32.463 33.644,31.282 33.892,31.035 35.387,31.035 36.067,31.716 36.067,32.37 36.967,32.37 36.967,33.828 34.372,33.828 33.255,33.828
2122_VCC on TopLayer "2122_VCC_L01_P048" (solid, remove dead copper, pour order 48): 33.716,27.007 34.884,27.007 35.1,26.791 35.1,24.03 35.027,23.957 33.576,23.957 33.274,24.258 33.274,25.08 33.54,25.346 33.681,25.346 33.885,25.55 33.885,26.627 33.709,26.802
SPI_1V8_CLK on TopLayer "SPI_1V8_CLK_L01_P044" (solid, remove dead copper, pour order 44): 24.995,33.919 27.103,33.919 27.238,33.784 27.238,30.215 27.114,30.091 25.046,30.091 24.995,30.142
SPI_1V8_CLK on TopLayer "SPI_1V8_CLK_L01_P042" (solid, remove dead copper, pour order 42): 50.715,19.384 48.549,19.384 48.228,19.691 48.228,22.072 49.435,22.072 50.024,21.483 50.024,21.151 50.212,20.963 50.788,20.963 51.05,20.701 51.05,19.691 51.021,19.691
GND on Layer 1 "GND_L02_P177" (solid, remove dead copper, pour order 177): 22.15,2.4 ccw(c21.35,2.4) 21.35,3.2 0,3.2 0,83.2 70,83.2 70,3.2 48.65,3.2 ccw(c48.65,2.4) 47.85,2.4 47.85,0 31.9,0 31.9,3.25 ccw(c31.15,3.25) 30.4,3.25 30.4,0 22.15,0
PGND on Layer 1 "PGND_L02_P172" (solid, remove dead copper, pour order 172): 24.152,37.991 26.956,37.991 27.531,37.417 27.531,31.03 26.032,29.531 15.656,29.531 14.818,28.692 14.818,23.485 16.101,22.203 16.101,18.539 18.101,16.538 18.645,16.538 18.974,16.209 18.974,11.145 22.834,7.285 24.46,5.659 24.46,2.54 22.885,2.54 22.885,2.591 22.25,3.226 0.686,3.226 0.178,3.734 0.178,34.925 3.244,37.991
4610_FINE_V on Layer 2 "4610_FINE_V_L03_P087" (solid, pour order 87): 51.785,25.578 cw(c51.785,25.928) 51.435,25.928 51.437,26.163 cw(c51.562,26.187) 51.435,26.187 51.435,27.915 cw(c52.213,27.915) 52.213,28.692 57.566,28.692 cw(c57.566,27.229) 59.03,27.229 cw(c57.912,27.229) 57.912,26.111 56.642,26.111 ccw(c56.642,25.527) 56.058,25.527 56.058,11.074 cw(c55.423,11.074) 56.046,10.951 cw(c55.377,10.943) 55.384,10.275 53.157,10.275 cw(c53.157,10.625) 52.807,10.625 52.807,12.802 cw(c52.934,12.802) 52.934,12.929 ccw(c52.934,13.03) 53.035,13.03 53.035,25.07 ccw(c52.527,25.07) 52.527,25.578
2122_VCC on Layer 2 "2122_VCC_L03_P079" (solid, pour order 79): 33.096,27.076 cw(c32.033,27.076) 32.033,26.013 29.035,26.013 ccw(c29.035,25.298) 28.321,25.298 28.321,24.358 ccw(c28.593,24.358) 28.593,24.085 30.567,24.085 cw(c30.57,23.878) 30.777,23.881 ccw(c30.886,24.994) 30.886,23.876 34.112,23.876 ccw(c34.112,24.359) 34.595,24.359 34.595,31.902 cw(c35.128,31.902) 35.128,32.436 42.095,32.436 cw(c42.095,32.024) 42.507,32.024 42.507,26.022 ccw(c43.459,26.022) 43.459,25.07 ccw(c43.459,26.619) 45.009,26.619 45.009,33.17 ccw(c43.9,33.17) 43.9,34.279 33.847,34.279 ccw(c33.847,33.528) 33.096,33.528
2122_0VDD on Layer 2 "2122_0VDD_L03_P095" (solid, pour order 95): 33.368,23.559 34.566,23.559 ccw(c34.566,24.017) 35.024,24.017 35.024,25.067 cw(c35.677,25.067) 35.677,25.719 36.692,25.719 cw(c36.692,25.429) 36.982,25.429 36.982,24.142 cw(c34.442,24.142) 34.442,21.602 33.572,21.602 cw(c33.572,21.806) 33.368,21.806
no net on Layer 2 "NONET_L03_P093" (solid, pour order 93): 29.362,24.232
no net on Layer 2 "NONET_L03_P058" (solid, pour order 58): 24.765,28.905
4610_FINE_V on Layer 3 "4610_FINE_V_L04_P089" (solid, pour order 89): 22.707,30.011 cw(c22.276,30.011) 22.276,29.58 21.338,29.58 cw(c21.338,30.311) 20.607,30.311 20.607,38.241 cw(c21.075,38.241) 21.075,38.71 29.642,38.71 cw(c29.642,37.871) 30.48,37.871 ccw(c31.311,37.871) 31.311,37.04 59.919,37.04 cw(c59.919,34.5) 62.459,34.5 62.459,27.33 cw(c61.265,27.33) 61.265,26.137 55.202,26.137 cw(c55.202,28.677) 52.662,28.677 52.662,33.165 ccw(c51.562,33.165) 51.562,34.265 25.247,34.265 ccw(c25.247,31.725) 22.707,31.725
SPI_1V8_CLK on Layer 3 "SPI_1V8_CLK_L04_P078" (solid, remove dead copper, pour order 78): 49.434,34.061 50.739,32.756 50.739,23 50.739,14.935 ccw(c53.279,14.935) 53.279,12.395 54.625,12.395 63.348,12.395 ccw(c63.348,13.411) 64.364,13.411 64.364,21.292 cw(c64.789,21.292) 64.789,21.717 66.472,21.717 cw(c66.472,20.98) 67.208,20.98 67.208,12.573 cw(c64.668,12.573) 64.668,10.033 50.444,10.033 cw(c50.444,10.82) 49.657,10.82 ccw(c48.971,10.82) 48.971,11.506 47.727,11.506 cw(c47.727,14.046) 45.187,14.046 45.187,21.285 ccw(c42.721,21.286) 45.186,21.336 45.187,27.783 ccw(c42.647,27.783) 42.647,30.323 28.593,30.323 ccw(c28.448,27.804) 28.448,30.328 25.298,30.328 cw(c25.298,30.582) 25.044,30.582 25.044,34.036 25.324,34.061
2122_0VDD on Layer 3 "2122_0VDD_L04_P120" (solid, remove dead copper, pour order 120): 35.166,25.753 35.166,23.965 35.403,23.728 42.177,23.728 42.255,23.806 42.255,25.685 42.067,25.873 39.581,25.873 35.286,25.873
VDD_IO on Layer 3 "VDD_IO_L04_P112" (solid, pour order 112): 61.382,14.55 62.435,14.55 cw(c62.435,14.38) 62.605,14.38 62.605,13.086 cw(c62.241,13.086) 62.241,12.722 cw(c62.241,13.611) 61.351,13.611 61.351,14.476
no net on Layer 3 "NONET_L04_P083" (solid, pour order 83): 51.486,25.425
no net on Layer 3 "NONET_L04_P082" (solid, pour order 82): 51.79,27.965
GND on Bottom Layer "GND_L06_P184" (solid, remove dead copper, pour order 184): 17.31,52.273 17.31,42.668 20.797,39.181 20.84,39.225 26.763,39.226 26.764,39.225 67.379,39.225 69.596,37.008 69.596,4.387 68.536,3.327 32.313,3.327 31.977,3.663 31.977,4.064 30.445,4.064 30.242,3.861 30.242,3.024 29.947,2.728 25.207,2.728 24.895,3.04 24.895,5.3 24.734,5.3 22.241,7.792 20.369,7.792 13.523,14.639 13.523,20.339 11.602,22.26 8.729,22.26 1.346,29.642 1.346,55.093 14.49,55.093
3V3_DIGIT on Bottom Layer "3V3_DIGIT_L06_P168" (solid, remove dead copper, pour order 168): 19.025,12.781 19.025,13.742 20.625,13.742 20.774,13.593 22.249,13.593 22.249,12.881 19.56,12.881 19.46,12.781
VDD_CORE on Bottom Layer "VDD_CORE_L06_P103" (solid, pour order 103): 59.888,25.477 59.888,24.631 59.563,24.306 59.16,24.287 58.504,24.287 ccw(c58.504,23.845) 58.063,23.845 58.063,22.806 57.823,22.806 57.823,24.306 59.122,25.606 59.442,25.602 59.763,25.602
2122_VCC on Bottom Layer "2122_VCC_L06_P097" (solid, pour order 97): 34.963,33.774 cw(c34.963,33.394) 35.343,33.394 ccw(c35.613,33.394) 35.613,33.124 35.623,33.124 cw(c35.623,32.505) 36.242,32.505 36.242,32.031 cw(c35.263,32.031) 35.263,31.052 34.07,31.052 cw(c34.07,31.455) 33.666,31.455 33.666,32.476 33.671,32.476 33.671,32.552 ccw(c33.481,32.552) 33.481,32.742 cw(c33.481,32.946) 33.276,32.946 33.276,33.841 ccw(c33.343,33.841) 33.343,33.774
+12 on Bottom Layer "+12_L06_P167" (solid, pour order 167): 24.7,2.32 24.7,5.184 24.274,5.61 5.113,5.61 4.642,5.139 4.642,3.384 4.724,3.302 20.701,3.302 20.752,3.353 22.574,3.353 23.3,2.627 23.3,2.32
2122_0VDD on Bottom Layer "2122_0VDD_L06_P073" (solid, pour order 73): 35.347,25.704 35.253,25.61 ccw(c35.393,25.552) 35.241,25.552 35.241,23.972 35.481,23.732 36.588,23.732 36.779,23.922 36.779,25.606 36.684,25.7 35.894,25.704
2122_VCC on Bottom Layer "2122_VCC_L06_P077" (solid, pour order 77): 44.104,25.742 43.929,25.567 41.603,25.567 41.504,25.666 41.504,26.792 44.038,26.792 44.104,26.727
NetC185_1 on Bottom Layer "NETC185_1_L06_P196" (solid, remove dead copper, pour order 196): 27.337,73.262 27.337,74.075 27.78,74.517 29.938,74.517 30.125,74.331 30.125,71.808 29.787,71.47 28.052,71.47 27.662,71.86 27.662,72.937
VDDO_1/2 on Bottom Layer "VDDO_1/2_L06_P101" (solid, pour order 101): 64.024,20.974 64.321,20.677 64.321,19.981 64.175,19.841 cw(c64.126,20.084) 64.126,19.836 61.293,19.836 61.293,20.356 61.91,20.974
VDDO_6 on Bottom Layer "VDDO_6_L06_P121" (solid, pour order 121): 54.138,16.129 53.14,16.129 cw(c53.14,16.336) 52.933,16.336 ccw(c52.773,16.336) 52.773,16.496 50.91,16.496 ccw(c50.91,16.349) 50.763,16.349 50.763,15.344 ccw(c50.885,15.344) 50.885,15.222 51.027,15.222 cw(c51.027,15.049) 51.2,15.049 51.2,14.292 ccw(c51.343,14.292) 51.343,14.149 51.718,14.149 ccw(c51.718,14.519) 52.088,14.519 52.088,15.061 cw(c52.634,15.061) 52.634,15.606 53.792,15.606 ccw(c53.792,15.958) 54.144,15.958
VDD_PLL2OSC on Bottom Layer "VDD_PLL2OSC_L06_P045" (solid, remove dead copper, pour order 45): 53.073,25.444 54.684,25.444 55.193,24.935 55.193,24.561 55.663,24.091 55.894,24.091 56.063,23.922 56.063,22.806 55.823,22.806 55.823,23.427 55.643,23.606 53.603,23.606 53.078,24.131 53.078,24.176
VDDO_9/10 on Bottom Layer "VDDO_9/10_L06_P106" (solid, pour order 106): 51.15,19.943 52.737,19.943 cw(c52.737,19.836) 52.845,19.836 ccw(c52.883,19.836) 52.883,19.798 53.934,19.798 ccw(c53.934,19.956) 54.093,19.956 54.093,19.957 ccw(c53.874,19.957) 53.874,20.175 53.112,20.175 cw(c53.112,20.236) 53.051,20.236 53.051,20.63 ccw(c52.845,20.63) 52.845,20.836 52.722,20.836 cw(c52.722,20.948) 52.61,20.948 ccw(c52.532,20.948) 52.532,21.027 51.256,21.027 ccw(c51.256,20.928) 51.157,20.928
VDDO_7/8 on Bottom Layer "VDDO_7/8_L06_P107" (solid, pour order 107): 51.15,17.142 51.253,17.039 52.157,17.039 52.285,17.167 52.285,17.443 52.778,17.443 52.909,17.312 54.083,17.312 ccw(c54.058,17.336) 54.093,17.336 54.093,17.576 ccw(c54.018,17.576) 54.018,17.651 53.201,17.651 cw(c53.201,17.699) 53.154,17.699 53.154,18.341 52.777,18.718 51.333,18.718 51.15,18.534
VDDO_5 on Bottom Layer "VDDO_5_L06_P098" (solid, pour order 98): 61.293,15.042 61.748,14.586 62.18,14.586 62.441,14.325 62.441,13.653 62.721,13.373 63.957,13.373 64.157,13.573 64.157,14.279 64.527,14.648 64.842,14.648 64.842,15.406 64.478,15.77 62.765,15.77 62.459,16.076 61.293,16.076
2122_VCC on Bottom Layer "2122_VCC_L06_P153" (solid, remove dead copper, pour order 153): 35.217,26.567 35.145,26.64 33.896,26.64 33.782,26.526 33.782,25.243 33.66,25.121 33.66,24.216 33.7,24.176 34.987,24.176 35.094,24.283 35.094,25.653 35.167,25.726 35.505,25.726 35.567,25.789 35.567,26.442 ccw(c35.442,26.442) 35.442,26.567
2122_VCC on Bottom Layer "2122_VCC_L06_P096" (solid, pour order 96): 41.993,33.857 cw(c42.119,33.857) 42.119,33.983 42.814,33.983 cw(c42.811,33.665) 43.129,33.663 43.129,32.374 ccw(c43.289,32.374) 43.289,32.214 cw(c43.289,32.06) 43.443,32.06 43.443,31.317 cw(c43.193,31.317) 43.193,31.067 41.706,31.067 cw(c41.706,31.531) 41.242,31.531 41.242,32.119 ccw(c40.956,32.119) 41.237,32.175 41.237,33.062 cw(c41.378,33.062) 41.378,33.203 41.456,33.203 ccw(c41.456,33.74) 41.993,33.74
PGND on Bottom Layer "PGND_L06_P189" (solid, remove dead copper, pour order 189): 1.346,29.329 8.673,22.002 11.499,22.002 13.203,20.298 13.203,14.61 18.762,9.051 18.762,5.967 4.838,5.967 4.171,5.3 4.171,3.752 3.975,3.556 1.829,3.556 1.346,4.039
no net on Bottom Layer "NONET_L06_P186" (solid, remove dead copper, pour order 186): 56.823,15.606
no net on Bottom Layer "NONET_L06_P183" (solid, remove dead copper, pour order 183): 8.017,80.432
GND_ATT on Layer 4 "GND_ATT_L05_P170" (solid, remove dead copper, pour order 170): 8.118,46.84 ccw(c10.658,46.84) 10.658,44.3 61.202,44.3 ccw(c61.202,46.84) 63.742,46.84 63.703,49.578 63.703,78.595 ccw(c61.163,78.595) 61.163,81.135 8.514,81.135 ccw(c8.514,80.74) 8.118,80.74
GND on Layer 4 "GND_L05_P174" (solid, remove dead copper, pour order 174): 9.846,43.739 8.915,43.739 6.274,41.097 6.274,23.52 7.899,21.895 11.369,21.895 12.725,20.539 12.725,11.862 15.117,9.471 20.704,9.471 24.917,5.257 24.917,2.54 30.023,2.54 30.29,2.808 30.29,3.925 30.531,4.166 31.674,4.166 31.977,3.862 31.977,2.922 32.334,2.565 47.219,2.565 48.209,3.556 68.301,3.556 69.621,4.877 69.621,38.537 67.34,40.818 64.885,40.818 62.065,43.637 61.544,43.637
no net on Layer 4 "NONET_L05_P173" (solid, remove dead copper, pour order 173): 33.985,43.282

## Silkscreen, mask and mechanical layers (free items; w line width, h text height)
Bottom Overlay:
  drawing of 42 lines, arcs and shapes, not listed
PCI-SIG Outline:
  lines w0.1: 21.35,3.2 cw(c21.35,2.4) 22.15,2.4
Mechanical14:
  text "Zegar referencyjny z MB na dystrybutor na karcie CLKIN nie jest powiązonay długością" at -76.665,79.123 h1
  text "Sygnał CLK do FPGA oraz Sysref do złącza karty RF są powiązane" at -76.865,75.923 h1
  text "Sygnał danych oraz SYNC z ADC do FPGA są powiązane ze sobą" at -76.865,73.148 h1
  text "Sygna zegarowy z Zegara do ADC oraz SYSREF z zegara do ADC są powiązane" at -76.79,70.548 h1

## Dimensions
0,83.2 to 70,83.2 on TopLayer
70,3.2 to 70,83.2 on TopLayer
22.15,0 to 0,83.2 on TopLayer